# Altium PCB ide_podule-8bit.PcbDoc
Units mm, origin at the board's own origin, x right, y up, seen from the top; angles counter-clockwise.
Board outline 142.24 x 34.29 mm, 4 copper layers (F.Cu, In1.Cu, In2.Cu, B.Cu); 37 components, 113 nets, 366 pads, 163 vias.
Unrouted connection lines stored in the file: 1.
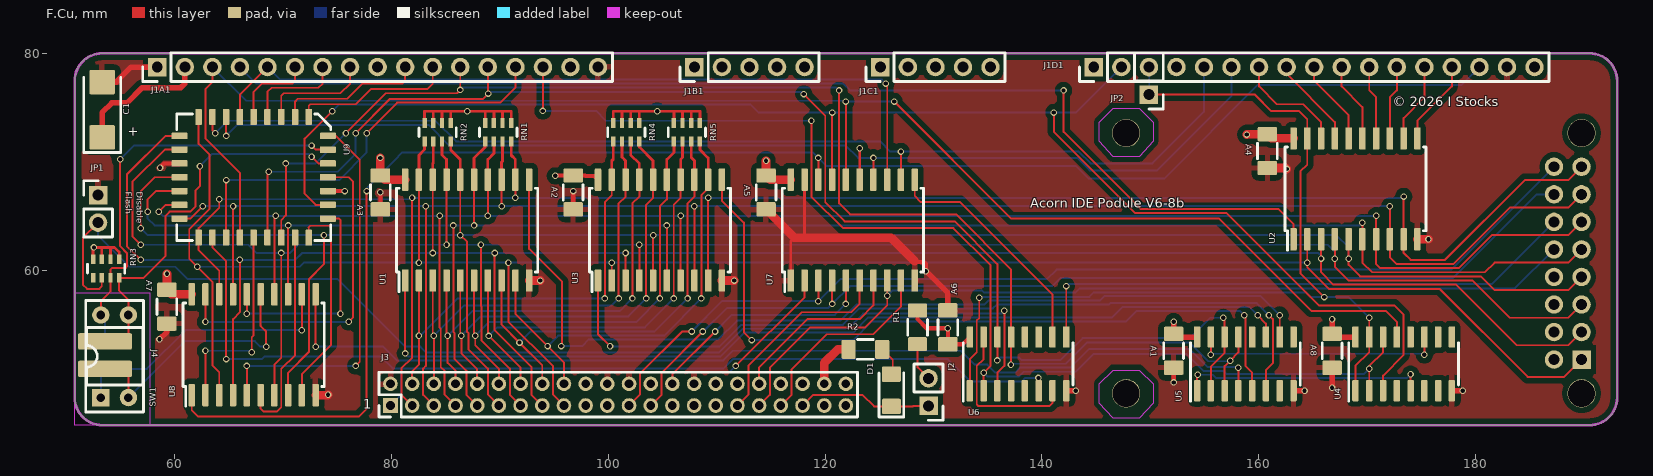
[diagram p0: F.Cu view]
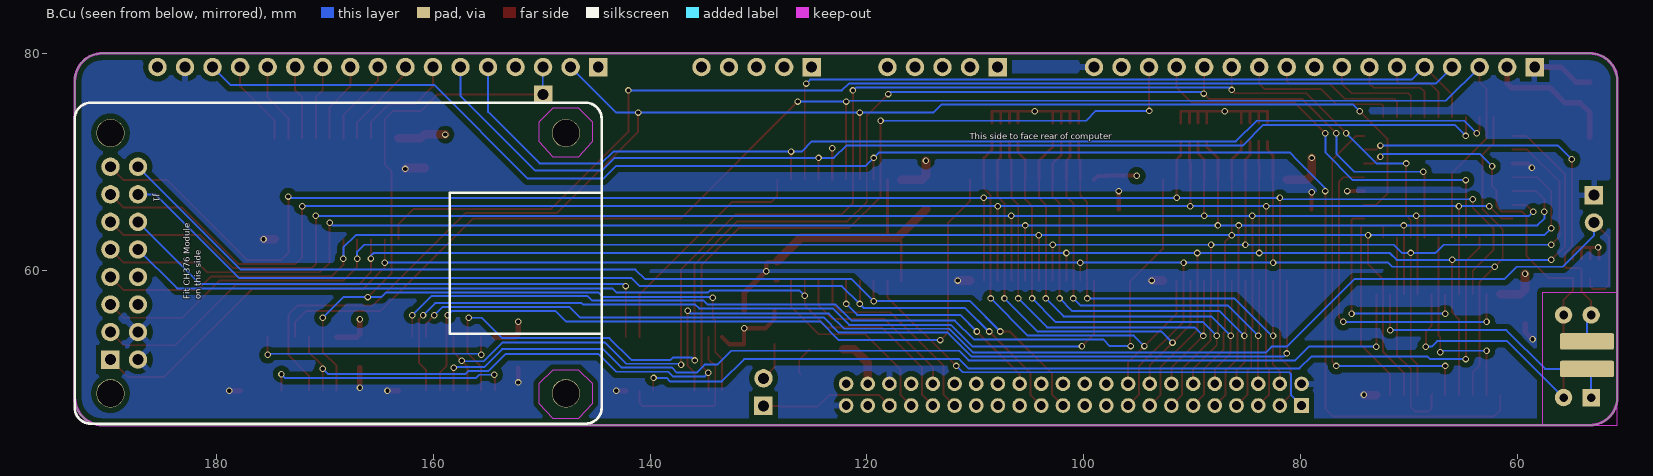
[diagram p1: B.Cu view, seen from below]
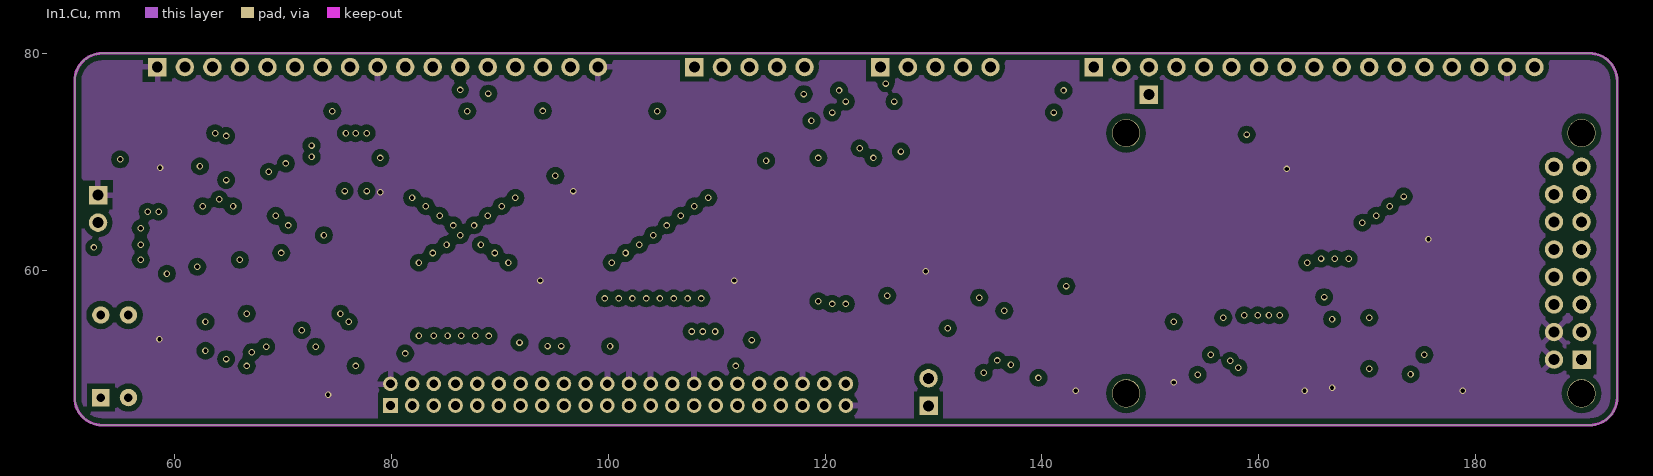
[diagram p2: In1.Cu]
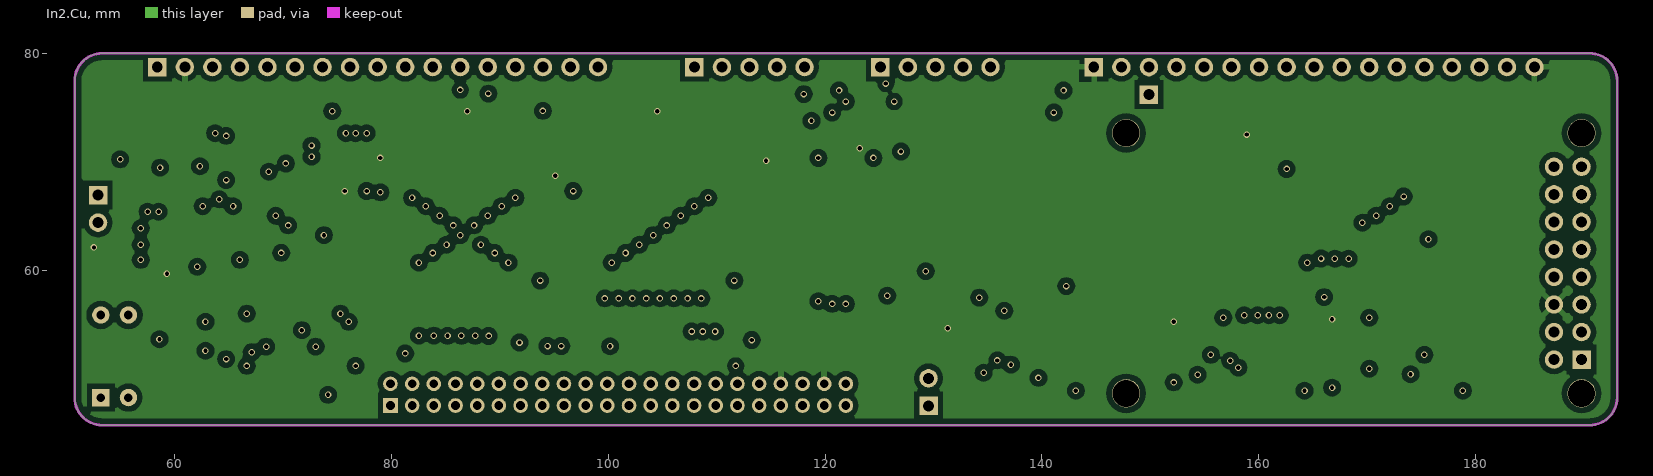
[diagram p3: In2.Cu]

## Layer stack, top to bottom
F.Mask: solder mask 0.0102, Solder Resist, Dk 3.5
F.Cu: signal copper 0.0356
Dielectric 1: dielectric 0.32, FR-4, Dk 4.8
In1.Cu: signal copper 0.0356
Dielectric2: dielectric 0.32, FR-4, Dk 4.8
In2.Cu: signal copper 0.0356
Dielectric3: dielectric 0.32, FR-4, Dk 4.8
B.Cu: signal copper 0.0356
B.Mask: solder mask 0.0102, Solder Resist, Dk 3.5

## Board outline
193.04,77.47 193.04,48.26 cw(c190.5,48.26) 190.5,45.72 53.34,45.72 cw(c53.34,48.26) 50.8,48.26 50.8,77.47 cw(c53.34,77.47) 190.5,80.01 cw(c190.5,77.47) 193.04,77.47

## Design rules (kind name [scope] priority, off if disabled: settings)
Clearance "Clearence 0.508_Polygon" [InNamedPolygon('F.Cu-GND') OR InNamedPolygon('In1.Cu-GND') OR InNamedPolygon('B.Cu-GND') OR InNamedPolygon('In2.Cu-VCC')] p1: gap=0.508 ignorepadtopadclearanceinfootprint=FALSE
Clearance "Clearence 0.2_NetClass" [InNetClass('Power')] p2: gap=0.2 ignorepadtopadclearanceinfootprint=FALSE
Clearance "Clearence 0.1778_NetClass" [InNetClass('Default')] p3: gap=0.178 ignorepadtopadclearanceinfootprint=FALSE
MinimumSolderMaskSliver [All] p1: minsoldermaskwidth=0
PolygonConnect Polygon_In2.Cu-VCC_ConnectDirect [IsNamedPolygon('In2.Cu-VCC') vs IsVia] p1: connectstyle=Direct reliefconductorwidth=0.254 reliefentries=4 polygonreliefangle="90 Angle" airgapwidth=0.254
PolygonConnect Polygon_In2.Cu-VCC_ConnectRelief45 [IsNamedPolygon('In2.Cu-VCC') vs (IsThruPin or IsSMTPin) and (PadShape_AllLayers = 'Round')] p2: connectstyle=Relief reliefconductorwidth=0.508 reliefentries=4 polygonreliefangle="45 Angle" airgapwidth=0.508
PolygonConnect Polygon_In2.Cu-VCC_ConnectRelief90 [IsNamedPolygon('In2.Cu-VCC') vs (IsThruPin or IsSMTPin) and (PadShape_AllLayers <> 'Round')] p3: connectstyle=Relief reliefconductorwidth=0.508 reliefentries=4 polygonreliefangle="90 Angle" airgapwidth=0.508
PolygonConnect Polygon_B.Cu-GND_ConnectDirect [IsNamedPolygon('B.Cu-GND') vs IsVia] p4: connectstyle=Direct reliefconductorwidth=0.254 reliefentries=4 polygonreliefangle="90 Angle" airgapwidth=0.254
PolygonConnect Polygon_B.Cu-GND_ConnectRelief45 [IsNamedPolygon('B.Cu-GND') vs (IsThruPin or IsSMTPin) and (PadShape_AllLayers = 'Round')] p5: connectstyle=Relief reliefconductorwidth=0.508 reliefentries=4 polygonreliefangle="45 Angle" airgapwidth=0.508
PolygonConnect Polygon_B.Cu-GND_ConnectRelief90 [IsNamedPolygon('B.Cu-GND') vs (IsThruPin or IsSMTPin) and (PadShape_AllLayers <> 'Round')] p6: connectstyle=Relief reliefconductorwidth=0.508 reliefentries=4 polygonreliefangle="90 Angle" airgapwidth=0.508
PolygonConnect Polygon_In1.Cu-GND_ConnectDirect [IsNamedPolygon('In1.Cu-GND') vs IsVia] p7: connectstyle=Direct reliefconductorwidth=0.254 reliefentries=4 polygonreliefangle="90 Angle" airgapwidth=0.254
PolygonConnect Polygon_In1.Cu-GND_ConnectRelief45 [IsNamedPolygon('In1.Cu-GND') vs (IsThruPin or IsSMTPin) and (PadShape_AllLayers = 'Round')] p8: connectstyle=Relief reliefconductorwidth=0.508 reliefentries=4 polygonreliefangle="45 Angle" airgapwidth=0.508
PolygonConnect Polygon_In1.Cu-GND_ConnectRelief90 [IsNamedPolygon('In1.Cu-GND') vs (IsThruPin or IsSMTPin) and (PadShape_AllLayers <> 'Round')] p9: connectstyle=Relief reliefconductorwidth=0.508 reliefentries=4 polygonreliefangle="90 Angle" airgapwidth=0.508
PolygonConnect Polygon_F.Cu-GND_ConnectDirect [IsNamedPolygon('F.Cu-GND') vs IsVia] p10: connectstyle=Direct reliefconductorwidth=0.254 reliefentries=4 polygonreliefangle="90 Angle" airgapwidth=0.254
PolygonConnect Polygon_F.Cu-GND_ConnectRelief45 [IsNamedPolygon('F.Cu-GND') vs (IsThruPin or IsSMTPin) and (PadShape_AllLayers = 'Round')] p11: connectstyle=Relief reliefconductorwidth=0.508 reliefentries=4 polygonreliefangle="45 Angle" airgapwidth=0.508
PolygonConnect Polygon_F.Cu-GND_ConnectRelief90 [IsNamedPolygon('F.Cu-GND') vs (IsThruPin or IsSMTPin) and (PadShape_AllLayers <> 'Round')] p12: connectstyle=Relief reliefconductorwidth=0.508 reliefentries=4 polygonreliefangle="90 Angle" airgapwidth=0.508
RoutingVias [All] p1: holewidth=0.711 width=1.27 viastyle="Through Hole" minholewidth=0.711 minwidth=1.27 maxholewidth=0.711 maxwidth=1.27
SilkToSilkClearance [All] p1: silktosilkclearance=0
SilkToSolderMaskClearance [IsPad] p1: minsilkscreentomaskgap=0 clearancetoexposedcopper=TRUE
SolderMaskExpansion [All] p1: expansion=0 istentingtop=FALSE
Width [All] p1: maxlimit=10 minlimit=0.254 preferedwidth=0.254 toplayer_prefwidth=0.178 midlayer1_maxwidth=0.254 midlayer2_prefwidth=0.178 bottomlayer_prefwidth=0.178 minimp=50.000000 maximp=50.000000 favimp=50.000000
27 further rules are at their usual default settings.

## Classes and differential pairs
net class Power: GND VCC
net class Default: BCS0 BCSEL BD0 BD1 BD2 BD3 BD4 BD5 BD6 BD7 BLA2 BLA3 BLA4 CLK2 CS0 D0 D1 D2 D3 D4 D5 D6 D7 D8 D9 D10 D11 D12 D13 D14 D15 F_CE F_EN L0 L1 L2 L3 L4 L5 L6 L7 LA2 LA3 LA4 LA5 LA6 LA7 LA8 LA9 LA10 LA11 LA12 LA13 LRC LROE LWC LWOE Net-(D1-A) Net-(D1-K) Net-(J1D1-P3) Net-(J2-P2) Net-(J4-Pin_2) Net-(J4-Pin_4) Net-(U4A-O1) Net-(U4B-O1) Net-(U6A-O3) PLatch PR{slash}{\W\}\ unconnected-(J1-Pin_8-Pad8) unconnected-(J1A1-P16-Pad16) unconnected-(J1B1-P1-Pad1) unconnected-(J1B1-P2-Pad2) unconnected-(J1B1-P3-Pad3) unconnected-(J1B1-P4-Pad4) unconnected-(J1B1-P5-Pad5) unconnected-(J1C1-P1-Pad1) unconnected-(J1C1-P2-Pad2) unconnected-(J1C1-P3-Pad3) unconnected-(J1C1-P4-Pad4) unconnected-(J1C1-P5-Pad5) unconnected-(J3-P19-Pad19) unconnected-(J3-P20-Pad20) unconnected-(J3-P21-Pad21) unconnected-(J3-P27-Pad27) unconnected-(J3-P29-Pad29) unconnected-(J3-P31-Pad31) unconnected-(J3-P32-Pad32) unconnected-(J3-P34-Pad34) unconnected-(J3-P44-Pad44) unconnected-(RN3-R4.2-Pad5) unconnected-(U4A-O0-Pad4) unconnected-(U4A-O2-Pad6) unconnected-(U4A-O3-Pad7) unconnected-(U4B-O0-Pad12) unconnected-(U4B-O2-Pad10) unconnected-(U4B-O3-Pad9) unconnected-(U5A-O3-Pad7) unconnected-(U5B-O0-Pad12) unconnected-(U5B-O3-Pad9) unconnected-(U6A-O0-Pad4) unconnected-(U6A-O1-Pad5) unconnected-(U6B-O0-Pad12) unconnected-(U6B-O1-Pad11) {\B\I\O\R\D\}\ {\B\I\O\W\R\}\ {\I\O\R\D\}\ {\I\O\W\R\}\ {\P\S\}\ {\R\S\T\-\B\}\ {\R\S\T\}\ {\U\S\B\_\C\S\}\

## Components (designator, comment, footprint, x,y, rotation, side; value= is the part's Value field where it differs from the comment)
A1 "Comment" C_1206_3216Metric_Pad1.33x1.80mm_HandSolder 152.146,52.578 r270 top value=100n
A2 "Comment" C_1206_3216Metric_Pad1.33x1.80mm_HandSolder 96.774,67.183 r270 top value=100n
A3 "Comment" C_1206_3216Metric_Pad1.33x1.80mm_HandSolder 78.994,67.183 r270 top value=100n
A4 "Comment" C_1206_3216Metric_Pad1.33x1.80mm_HandSolder 160.782,70.993 r270 top value=100n
A5 "Comment" C_1206_3216Metric_Pad1.33x1.80mm_HandSolder 114.554,67.183 r270 top value=100n
A6 "Comment" C_1206_3216Metric_Pad1.33x1.80mm_HandSolder 131.318,54.737 r90 top value=100n
A7 "Comment" C_1206_3216Metric_Pad1.33x1.80mm_HandSolder 59.309,56.642 r270 top value=100n
A8 "Comment" C_1206_3216Metric_Pad1.33x1.80mm_HandSolder 166.751,52.578 r270 top value=100n
C1 "Comment" CP_EIA-6032-20_AVX-F_Pad2.25x2.35mm_HandSolder 53.34,74.803 r90 top value="47uF 16V"
D1 "Comment" LED_1206_3216Metric_Pad1.42x1.75mm_HandSolder 126.111,48.931 r90 top value=LED
J1 "Comment" CH376-mod 189.758,69.545 r90 bottom value=Conn_02x08_Odd_Even
J1A1 "Comment" PinHeader_1x17_P2.54mm_Vertical 58.42,78.74 r90 top value=CONN_01X17
J1B1 "Comment" PinHeader_1x05_P2.54mm_Vertical 107.95,78.74 r90 top value=CONN_01X05
J1C1 "Comment" PinHeader_1x05_P2.54mm_Vertical 125.095,78.74 r90 top value=CONN_01X05
J1D1 "Comment" PinHeader_1x17_P2.54mm_Vertical 144.78,78.74 r90 top value=CONN_01X17
J2 "Comment" PinHeader_1x02_P2.54mm_Vertical 129.54,47.498 r180 top value=CONN_01X02
J3 "Comment" PinHeader_2x22_P2.00mm_Vertical 79.92,47.53 r90 top value=CONN_02X20
J4 "Comment" "4 way edge" 51.054,50.902 r90 top value=Conn_01x04_Socket
JP1 "Comment" PinHeader_1x02 52.959,66.934 r0 top value=Jumper_NC_Small
JP2 "Comment" PinHeader_1x02-linked 149.86,76.195 r180 top value=Jumper
R1 "Comment" R_1206_3216Metric_Pad1.30x1.75mm_HandSolder 128.524,54.737 r90 top value=330R
R2 "Comment" R_1206_3216Metric_Pad1.30x1.75mm_HandSolder 123.724,52.705 r180 top value=330R
RN1 "Comment" R_Array_Concave_4x0603 89.859,72.732 r270 top value=4K7
RN2 "Comment" R_Array_Concave_4x0603 84.271,72.732 r270 top value=4K7
RN3 "Comment" R_Array_Concave_4x0603 53.702,60.159 r270 top value=4K7
RN4 "Comment" R_Array_Concave_4x0603 101.67,72.732 r270 top value=4K7
RN5 "Comment" R_Array_Concave_4x0603 107.258,72.732 r270 top value=4K7
SW1 "Comment" DIP-4_W7.62mm_Socket 53.213,48.26 r90 top value=SW_DIP_x02
U1 "Comment" SOIC-20W_7.5x12.8mm_P1.27mm 86.995,63.705 r90 top value=74HC574
U2 "Comment" SOIC-20W_7.5x12.8mm_P1.27mm 168.91,67.515 r90 top value=74HC245
U3 "Comment" SOIC-20W_7.5x12.8mm_P1.27mm 104.775,63.705 r90 top value=74HC574
U4 "Comment" SOIC-16_3.9x9.9mm_P1.27mm 173.355,51.37 r90 top value=74HC139
U5 "Comment" SOIC-16_3.9x9.9mm_P1.27mm 158.75,51.37 r90 top value=74HC139
U6 "Comment" SOIC-16_3.9x9.9mm_P1.27mm 137.795,51.37 r90 top value=74HC139
U7 "Comment" SOIC-20W_7.5x12.8mm_P1.27mm 122.555,63.705 r90 top value=74HC245
U8 "Comment" SOIC-20W_7.5x12.8mm_P1.27mm 67.31,53.135 r90 top value=74AHC273
U9 "Comment" PLCC-32_11.4x14.0mm_P1.27mm 67.31,68.58 r270 top value=SST39SF010

## Footprints (in the part's own frame and the unit in brackets; to place one, negate y for a bottom-side part, rotate by r counter-clockwise, add the part's x,y. Pads: shape width x height; smd on the part's side, far side on the other; paste and mask are expansions set on the pad)
"4 way edge" [mm]
  rrect25% 1.524x5 smd paste-5 mask+0.2: 1(0,-2.54) 2(2.54,-2.54)
  rrect25% 1.524x5 smd far side paste-5 mask+0.2: 3(0,-2.54) 4(2.54,-2.54)
C_1206_3216Metric_Pad1.33x1.80mm_HandSolder [mm]
  rrect19% 1.325x1.8 smd mask+0.2: 1(-1.562,0) 2(1.562,0)
  silkscreen extent -0.71,-0.91 0.71,0.91
CH376-mod [mm]
  rect 1.7x1.7 hole 1 paste-2539.97 mask+0.2: 1(-17.78,0)
  round 1.7 hole 1 paste-2539.97 mask+0.2: 2(-17.78,-2.54) 3(-15.24,0) 4(-15.24,-2.54) 5(-12.7,0) 6(-12.7,-2.54) 7(-10.16,0) 8(-10.16,-2.54) 9(-7.62,0) 10(-7.62,-2.54) 11(-5.08,0) 12(-5.08,-2.54) 13(-2.54,0) 14(-2.54,-2.54) 15(0,0) 16(0,-2.54)
  round 2.6 hole 2.5 paste-2539.97 mask+0.2: M(-20.89,-42) M(-20.89,0) M(3.11,-42) M(3.11,0)
  silkscreen extent -23.69,-45.3 5.91,3.3
CP_EIA-6032-20_AVX-F_Pad2.25x2.35mm_HandSolder [mm]
  rrect11% 2.25x2.35 smd mask+0.2: 1(-2.55,0) 2(2.55,0)
  silkscreen extent -3.94,-1.71 3,1.71
DIP-4_W7.62mm_Socket [mm]
  rect 1.6x1.6 hole 0.8 paste-2539.97 mask+0.2: 1(0,0)
  rrect100% 1.6x1.6 hole 0.8 paste-2539.97 mask+0.2: 2(0,-2.54) 3(7.62,-2.54) 4(7.62,0)
  silkscreen extent -1.33,-3.93 8.95,1.39
LED_1206_3216Metric_Pad1.42x1.75mm_HandSolder [mm]
  rrect18% 1.425x1.75 smd mask+0.2: 1(-1.488,0) 2(1.488,0)
  silkscreen extent -2.46,-1.13 1.6,1.13
PinHeader_1x02 [mm]
  rect 1.7x1.7 hole 1 paste-2539.97 mask+0.2: 1(0,0)
  rrect100% 1.7x1.7 hole 1 paste-2539.97 mask+0.2: 2(0,-2.54)
  silkscreen extent -1.33,-3.87 1.33,1.33
PinHeader_1x02-linked [mm]
  rect 1.7x1.7 hole 1 paste-2539.97 mask+0.2: 1(0,0)
  rrect100% 1.7x1.7 hole 1 paste-2539.97 mask+0.2: 2(0,-2.54)
  B.Cu region: 0,-1.778 -0.063,-1.778 -0.063,-0.762 0,-0.762
  silkscreen extent -1.33,-3.87 1.33,1.33
PinHeader_1x02_P2.54mm_Vertical [mm]
  rect 1.7x1.7 hole 1 paste-2539.97 mask+0.2: 1(0,0)
  rrect100% 1.7x1.7 hole 1 paste-2539.97 mask+0.2: 2(0,-2.54)
  silkscreen extent -1.33,-3.87 1.33,1.33
PinHeader_1x05_P2.54mm_Vertical [mm]
  rect 1.7x1.7 hole 1 paste-2539.97 mask+0.2: 1(0,0)
  rrect100% 1.7x1.7 hole 1 paste-2539.97 mask+0.2: 2(0,-2.54) 3(0,-5.08) 4(0,-7.62) 5(0,-10.16)
  silkscreen extent -1.33,-11.49 1.33,1.33
PinHeader_1x17_P2.54mm_Vertical [mm]
  rect 1.7x1.7 hole 1 paste-2539.97 mask+0.2: 1(0,0)
  rrect100% 1.7x1.7 hole 1 paste-2539.97 mask+0.2: 2(0,-2.54) 3(0,-5.08) 4(0,-7.62) 5(0,-10.16) 6(0,-12.7) 7(0,-15.24) 8(0,-17.78) 9(0,-20.32) 10(0,-22.86) 11(0,-25.4) 12(0,-27.94) 13(0,-30.48) 14(0,-33.02) 15(0,-35.56) 16(0,-38.1) 17(0,-40.64)
  silkscreen extent -1.33,-41.97 1.33,1.33
PinHeader_2x22_P2.00mm_Vertical [mm]
  rect 1.35x1.35 hole 0.8 paste-2539.97 mask+0.2: 1(0,0)
  rrect100% 1.35x1.35 hole 0.8 paste-2539.97 mask+0.2: 2(2,0) 3(0,-2) 4(2,-2) 5(0,-4) 6(2,-4) 7(0,-6) 8(2,-6) 9(0,-8) 10(2,-8) 11(0,-10) 12(2,-10) 13(0,-12) 14(2,-12) 15(0,-14) 16(2,-14) 17(0,-16) 18(2,-16) 19(0,-18) 20(2,-18) 21(0,-20) 22(2,-20) 23(0,-22) 24(2,-22) 25(0,-24) 26(2,-24) 27(0,-26) 28(2,-26) 29(0,-28) 30(2,-28) 31(0,-30) 32(2,-30) 33(0,-32) 34(2,-32) 35(0,-34) 36(2,-34) 37(0,-36) 38(2,-36) 39(0,-38) 40(2,-38) 41(0,-40) 42(2,-40) 43(0,-42) 44(2,-42)
  silkscreen extent -1.06,-43.06 3.06,1.06
PLCC-32_11.4x14.0mm_P1.27mm [mm]
  rrect25% 0.6x1.475 smd mask+0.2: 1(0,6.837) 2(-1.27,6.837) 3(-2.54,6.837) 4(-3.81,6.837) 14(-3.81,-6.837) 15(-2.54,-6.837) 16(-1.27,-6.837) 17(0,-6.837) 18(1.27,-6.837) 19(2.54,-6.837) 20(3.81,-6.837) 30(3.81,6.837) 31(2.54,6.837) 32(1.27,6.837)
  rrect25% 1.475x0.6 smd mask+0.2: 5(-5.563,5.08) 6(-5.563,3.81) 7(-5.563,2.54) 8(-5.563,1.27) 9(-5.563,0) 10(-5.563,-1.27) 11(-5.563,-2.54) 12(-5.563,-3.81) 13(-5.563,-5.08) 21(5.563,-5.08) 22(5.563,-3.81) 23(5.563,-2.54) 24(5.563,-1.27) 25(5.563,0) 26(5.563,1.27) 27(5.563,2.54) 28(5.563,3.81) 29(5.563,5.08)
  silkscreen extent -5.82,-7.09 5.82,7.09
R_1206_3216Metric_Pad1.30x1.75mm_HandSolder [mm]
  rrect19% 1.3x1.75 smd mask+0.2: 1(-1.55,0) 2(1.55,0)
  silkscreen extent -0.73,-0.91 0.73,0.91
R_Array_Concave_4x0603 [mm]
  rect 0.9x0.4 smd mask+0.2: 1(-0.85,1.2) 2(-0.85,0.4) 3(-0.85,-0.4) 4(-0.85,-1.2) 5(0.85,-1.2) 6(0.85,-0.4) 7(0.85,0.4) 8(0.85,1.2)
  silkscreen extent -0.4,-1.72 0.4,1.72
SOIC-16_3.9x9.9mm_P1.27mm [mm]
  rrect25% 1.95x0.6 smd mask+0.2: 1(-2.475,4.445) 2(-2.475,3.175) 3(-2.475,1.905) 4(-2.475,0.635) 5(-2.475,-0.635) 6(-2.475,-1.905) 7(-2.475,-3.175) 8(-2.475,-4.445) 9(2.475,-4.445) 10(2.475,-3.175) 11(2.475,-1.905) 12(2.475,-0.635) 13(2.475,0.635) 14(2.475,1.905) 15(2.475,3.175) 16(2.475,4.445)
  silkscreen extent -3.45,-5.06 1.95,5.06
SOIC-20W_7.5x12.8mm_P1.27mm [mm]
  rrect25% 2.05x0.6 smd mask+0.2: 1(-4.65,5.715) 2(-4.65,4.445) 3(-4.65,3.175) 4(-4.65,1.905) 5(-4.65,0.635) 6(-4.65,-0.635) 7(-4.65,-1.905) 8(-4.65,-3.175) 9(-4.65,-4.445) 10(-4.65,-5.715) 11(4.65,-5.715) 12(4.65,-4.445) 13(4.65,-3.175) 14(4.65,-1.905) 15(4.65,-0.635) 16(4.65,0.635) 17(4.65,1.905) 18(4.65,3.175) 19(4.65,4.445) 20(4.65,5.715)
  silkscreen extent -5.68,-6.51 3.86,6.51

## Part data
A1 A2 A3 A4 A5 A6 A7 A8: library part C_1206_3216Metric_Pad1.33x1.80mm_HandSolder, "Capacitor SMD 1206 (3216 Metric), square (rectangular) end terminal, IPC_7351 nominal with elongated pad for handsoldering. (Body size source: IPC-SM-782 page 76, https://www.pcb-3d.com/wordpress/wp-content/uploads/ipc-sm-782a_amendment_1_and_2.pdf), generated with kicad-footprint-generator", Footprint=Capacitor_SMD:C_1206_3216Metric_Pad1.33x1.80mm_HandSolder, ki_fp_filters=C_*
C1: library part CP_EIA-6032-20_AVX-F_Pad2.25x2.35mm_HandSolder, "Tantalum Capacitor SMD AVX-F (6032-20 Metric), IPC_7351 nominal, (Body size from: http://www.kemet.com/Lists/ProductCatalog/Attachments/253/KEM_TC101_STD.pdf), generated with kicad-footprint-generator", Footprint=Capacitor_Tantalum_SMD:CP_EIA-6032-20_AVX-F_Pad2.25x2.35mm_HandSolder, ki_fp_filters=CP_*
D1: library part LED_1206_3216Metric_Pad1.42x1.75mm_HandSolder, "LED SMD 1206 (3216 Metric), square (rectangular) end terminal, IPC_7351 nominal, (Body size source: http://www.tortai-tech.com/upload/download/2011102023233369053.pdf), generated with kicad-footprint-generator", Footprint=LED_SMD:LED_1206_3216Metric_Pad1.42x1.75mm_HandSolder, Description="Light emitting diode", ki_fp_filters="LED* LED_SMD:* LED_THT:*"
J1: library part CH376-mod, Footprint=Library:CH376-mod, Description="Generic connector, double row, 02x08, odd/even pin numbering scheme (row 1 odd numbers, row 2 even numbers), script generated (kicad-library-utils/schlib/autogen/connector/)", ki_fp_filters=Connector*:*_2x??_*
J1A1 J1D1: library part PinHeader_1x17_P2.54mm_Vertical, "Through hole straight pin header, 1x17, 2.54mm pitch, single row", Footprint=Connector_PinHeader_2.54mm:PinHeader_1x17_P2.54mm_Vertical, ki_fp_filters="Pin_Header_Straight_1X* Pin_Header_Angled_1X* Socket_Strip_Straight_1X* Socket_Strip_Angled_1X*"
J1B1 J1C1: library part PinHeader_1x05_P2.54mm_Vertical, "Through hole straight pin header, 1x05, 2.54mm pitch, single row", Footprint=Connector_PinHeader_2.54mm:PinHeader_1x05_P2.54mm_Vertical, ki_fp_filters="Pin_Header_Straight_1X* Pin_Header_Angled_1X* Socket_Strip_Straight_1X* Socket_Strip_Angled_1X*"
J2: library part PinHeader_1x02_P2.54mm_Vertical, "Through hole straight pin header, 1x02, 2.54mm pitch, single row", Footprint=Connector_PinHeader_2.54mm:PinHeader_1x02_P2.54mm_Vertical, ki_fp_filters="Pin_Header_Straight_1X* Pin_Header_Angled_1X* Socket_Strip_Straight_1X* Socket_Strip_Angled_1X*"
J3: library part PinHeader_2x22_P2.00mm_Vertical, "Through hole straight pin header, 2x22, 2.00mm pitch, double rows", Footprint=Connector_PinHeader_2.00mm:PinHeader_2x22_P2.00mm_Vertical, ki_fp_filters="Pin_Header_Straight_2X* Pin_Header_Angled_2X* Socket_Strip_Straight_2X* Socket_Strip_Angled_2X*"
J4: library part "4 way edge", Footprint="Library:4 way edge", Description="Generic connector, single row, 01x04, script generated", ki_fp_filters=Connector*:*_1x??_*
JP1: library part PinHeader_1x02, "Through hole straight pin header, 1x02, 2.54mm pitch, single row", Footprint=econet:PinHeader_1x02, ki_fp_filters=SolderJumper*Bridged*
JP2: library part PinHeader_1x02-linked, "Through hole straight pin header, 1x02, 2.54mm pitch, single row", Footprint=econet:PinHeader_1x02-linked, ki_fp_filters=SolderJumper*
R1 R2: library part R_1206_3216Metric_Pad1.30x1.75mm_HandSolder, "Resistor SMD 1206 (3216 Metric), square (rectangular) end terminal, IPC_7351 nominal with elongated pad for handsoldering. (Body size source: IPC-SM-782 page 72, https://www.pcb-3d.com/wordpress/wp-content/uploads/ipc-sm-782a_amendment_1_and_2.pdf), generated with kicad-footprint-generator", Footprint=Resistor_SMD:R_1206_3216Metric_Pad1.30x1.75mm_HandSolder, ki_fp_filters="R_* R_*"
RN1 RN2 RN3 RN4 RN5: library part R_Array_Concave_4x0603, "Thick Film Chip Resistor Array, Wave soldering, Vishay CRA06P (see cra06p.pdf)", Footprint=Resistor_SMD:R_Array_Concave_4x0603, Description=C1980, ki_fp_filters="DIP* SOIC*"
SW1: library part DIP-4_W7.62mm_Socket, "4-lead though-hole mounted DIP package, row spacing 7.62 mm (300 mils), Socket", Footprint=Package_DIP:DIP-4_W7.62mm_Socket, Description="2x DIP Switch, Single Pole Single Throw (SPST) switch, small symbol", ki_fp_filters=SW?DIP?x2*
U1 U2 U3 U7 U8: library part SOIC-20W_7.5x12.8mm_P1.27mm, "SOIC, 20 Pin (JEDEC MS-013AC, https://www.analog.com/media/en/package-pcb-resources/package/233848rw_20.pdf), generated with kicad-footprint-generator ipc_gullwing_generator.py", Footprint=Package_SO:SOIC-20W_7.5x12.8mm_P1.27mm
  U1 U3: Description=C22374074
  U8: Datasheet=https://assets.nexperia.com/documents/data-sheet/74AHC_AHCT273.pdf, ki_fp_filters="DIP?20* SO?20* SOIC?20*"
U4 U5 U6: library part SOIC-16_3.9x9.9mm_P1.27mm, "SOIC, 16 Pin (JEDEC MS-012AC, https://www.analog.com/media/en/package-pcb-resources/package/pkg_pdf/soic_narrow-r/r_16.pdf), generated with kicad-footprint-generator ipc_gullwing_generator.py", Footprint=Package_SO:SOIC-16_3.9x9.9mm_P1.27mm, Datasheet=http://www.ti.com/lit/gpn/sn74LS139, ki_fp_filters=DIP?16*
U9: library part PLCC-32_11.4x14.0mm_P1.27mm, "PLCC, 32 Pin (http://ww1.microchip.com/downloads/en/DeviceDoc/doc0015.pdf), generated with kicad-footprint-generator ipc_plcc_jLead_generator.py", Footprint=Package_LCC:PLCC-32_11.4x14.0mm_P1.27mm, Description=C645928

## Via types
v1: diameter 0.6, hole 0.4, F.Cu to B.Cu, tented both sides, 163 vias

## Nets (pads, with @x,y where several pads share a name; then routed paths per layer and width w, separated by ;. In a path a pad name is that pad's centre, name@x,y a point inside that pad or via, vN(x,y) a via of type N, cw(c..) or ccw(c..) an arc to the next point about the centre after c; other vN are vias at no path point)
BCS0: J3.37 U7.9 | length 18.6
  F.Cu w0.178: J3.37 116.916,48.526 116.916,50.876 120.142,54.102 124.46,54.102 127,56.642 U7.9
BCSEL: J3.28 U7.5 | length 21.7
  F.Cu w0.178: J3.28 105.92,50.421 v1(109.855,54.356) ; v1(121.92,56.896) U7.5
  B.Cu w0.178: v1(109.855,54.356) 111.379,55.88 120.904,55.88 v1(121.92,56.896)
BD0: J1D1.7 U2.18 | length 10.4
  F.Cu w0.178: J1D1.7 160.02,76.962 161.671,75.311 164.084,75.311 165.735,73.66 U2.18
BD1: J1D1.8 U2.17 | length 8.4
  F.Cu w0.178: J1D1.8 162.56,78.105 167.005,73.66 U2.17
BD2: J1D1.9 U2.16 | length 7.9
  F.Cu w0.178: J1D1.9 165.1,77.47 168.275,74.295 U2.16
BD3: J1D1.10 U2.15 | length 7.4
  F.Cu w0.178: J1D1.10 167.64,76.962 169.545,75.057 U2.15
BD4: J1D1.11 U2.14 | length 6.8
  F.Cu w0.178: J1D1.11 170.18,76.581 170.815,75.946 U2.14
BD5: J1D1.12 U2.13 | length 6.8
  F.Cu w0.178: U2.13 172.085,75.946 172.72,76.581 J1D1.12
BD6: J1D1.13 U2.12 | length 7.4
  F.Cu w0.178: U2.12 173.355,74.041 175.26,75.946 J1D1.13
BD7: J1D1.14 U2.11 | length 7.9
  F.Cu w0.178: U2.11 174.625,73.787 177.8,76.962 J1D1.14
BLA2: J1.10 J3.35 U7.8 | length 82.8
  F.Cu w0.178: J3.35 114.91,48.52 114.91,51.029 118.618,54.737 123.698,54.737 125.73,56.769 v1(125.73,57.658) U7.8
  B.Cu w0.178: v1(125.73,57.658) 126.191,58.119 134.478,58.119 134.635,57.963 143.104,57.963 143.463,58.322 183.615,58.322 J1.10
BLA3: J3.33 U7.6 | length 18.9
  F.Cu w0.178: J3.33 112.928,48.538 112.928,51.206 117.856,56.134 122.428,56.134 123.19,56.896 U7.6
BLA4: J3.36 U7.7 | length 16.7
  F.Cu w0.178: J3.36 113.92,51.055 118.364,55.499 123.19,55.499 124.46,56.769 U7.7
CLK2: J1D1.4
CS0: U6.10 U7.11 | length 21.9
  F.Cu w0.178: U7.11 128.27,66.853 128.829,66.294 132.461,66.294 140.97,57.785 U6.10
D0: J1.1 J3.17 RN2.5 U1.19 U2.2 U3.2 U8.3 U9.13 | length 191.6
  F.Cu w0.178: U9.13 62.23,71.653 63.246,70.637 63.246,65.659 61.366,63.779 61.366,61.062 v1(62.103,60.325) 63.5,58.928 63.5,51.232 64.135,50.597 U8.3 ; v1(82.55,60.706) U1.19 ; v1(90.805,60.706) 90.805,55.245 94.92,51.13 94.92,48.53 J3.17 ; U3.2 v1(100.33,60.706) ; U2.2 v1(164.465,60.706) 164.465,60.289 166.461,58.293 176.657,58.293 184.785,50.165 188.157,50.165 J1.1
  F.Cu w0.254: U1.19 82.55,70.612 83.071,71.133 RN2.5
  B.Cu w0.178: v1(62.103,60.325) 71.552,60.325 71.933,60.706 v1(82.55,60.706) v1(90.805,60.706) v1(100.33,60.706) v1(164.465,60.706)
D1: J1.3 J3.15 RN2.6 U1.18 U2.3 U3.3 U8.4 U9.14 | length 196
  F.Cu w0.178: v1(56.896,60.96) 55.626,62.23 55.626,68.834 59.182,72.39 U9.14 ; U8.4 65.405,55.499 66.04,56.134 v1(66.04,60.96) ; v1(83.82,61.595) U1.18 ; v1(89.535,61.595) 89.535,54.483 92.913,51.105 92.913,48.537 J3.15 ; U3.3 v1(101.6,61.595) ; U2.3 v1(165.735,61.087) 165.735,59.817 166.878,58.674 178.181,58.674 183.769,53.086 188.538,53.086 J1.3
  F.Cu w0.254: U1.18 83.82,69.85 83.871,69.901 RN2.6
  B.Cu w0.178: v1(56.896,60.96) v1(66.04,60.96) 71.158,60.96 71.793,61.595 v1(83.82,61.595) v1(89.535,61.595) v1(101.6,61.595) 165.481,61.595 165.735,61.341 v1(165.735,61.087)
D2: J1.5 J3.13 RN2.7 U1.17 U2.4 U3.4 U8.7 U9.15 | length 193.8
  F.Cu w0.178: v1(56.896,62.357) 56.134,63.119 56.134,68.148 59.106,71.12 U9.15 ; U8.7 69.215,51.283 69.85,51.918 v1(69.85,61.599) ; v1(85.09,62.357) U1.17 ; v1(88.265,62.357) 88.265,56.71 88.333,56.642 88.333,53.526 90.932,50.927 90.932,48.518 J3.13 ; U3.4 v1(102.87,62.357) ; U2.4 v1(167.005,61.062) 167.005,60.325 168.275,59.055 179.705,59.055 183.134,55.626 188.538,55.626 J1.5
  F.Cu w0.254: RN2.7 84.671,70.65 85.09,70.231 U1.17
  B.Cu w0.178: v1(56.896,62.357) 66.802,62.357 67.56,61.599 v1(69.85,61.599) 70.667,61.599 71.425,62.357 v1(85.09,62.357) v1(88.265,62.357) v1(102.87,62.357) 166.37,62.357 167.005,61.722 v1(167.005,61.062)
D3: J1.7 J3.11 RN2.8 U1.16 U2.5 U3.5 U8.8 U9.17 | length 192.5
  F.Cu w0.178: v1(56.896,63.881) 56.896,67.31 58.166,68.58 U9.17 ; U8.8 70.485,50.546 72.41,52.471 72.41,59.188 73.787,60.564 v1(73.787,63.246) ; U1.16 v1(86.36,63.246) 86.995,62.611 86.995,54.325 87.1,54.22 87.1,52.727 88.9,50.927 88.9,48.55 J3.11 ; U3.5 v1(104.14,63.246) ; U2.5 v1(168.275,61.062) 168.275,60.503 169.342,59.436 180.467,59.436 181.737,58.166 188.538,58.166 J1.7
  F.Cu w0.254: RN2.8 85.471,71.12 86.36,70.231 U1.16
  B.Cu w0.178: v1(56.896,63.881) 57.531,63.246 v1(73.787,63.246) v1(86.36,63.246) v1(104.14,63.246) 167.132,63.246 168.275,62.103 v1(168.275,61.062)
D4: J1.9 J3.9 RN1.5 U1.15 U2.6 U3.6 U8.13 U9.18 | length 179.7
  F.Cu w0.178: v1(57.531,65.405) 57.531,66.548 58.293,67.31 U9.18 ; U8.13 v1(70.485,64.135) ; v1(85.725,64.135) 85.725,54.316 85.822,54.219 85.822,51.846 86.919,50.749 86.919,48.531 J3.9 ; v1(87.63,64.135) U1.15 ; U3.6 v1(105.41,64.135) ; v1(169.545,64.389) U2.6 169.545,60.706 170.434,59.817 180.848,59.817 181.737,60.706 188.538,60.706 J1.9
  F.Cu w0.254: U1.15 87.63,70.358 88.659,71.387 RN1.5
  B.Cu w0.178: v1(57.531,65.405) 57.531,64.77 58.166,64.135 v1(70.485,64.135) v1(85.725,64.135) v1(87.63,64.135) v1(105.41,64.135) 169.291,64.135 v1(169.545,64.389)
D5: J1.11 J3.7 RN1.6 U1.14 U2.7 U3.7 U8.14 U9.19 | length 178.4
  F.Cu w0.178: v1(58.547,65.405) 59.182,66.04 U9.19 ; U8.14 69.215,64.893 v1(69.346,65.024) ; v1(84.455,65.024) 84.455,54.725 84.559,54.621 84.559,51.077 84.912,50.724 84.912,48.538 J3.7 ; v1(88.9,65.024) U1.14 ; U3.7 v1(106.68,65.024) ; v1(170.815,65.024) U2.7 170.815,60.579 171.196,60.198 178.435,60.198 181.483,63.246 188.538,63.246 J1.11
  F.Cu w0.254: U1.14 88.9,70.231 89.459,70.79 RN1.6
  B.Cu w0.178: v1(58.547,65.405) 58.928,65.024 v1(69.346,65.024) v1(84.455,65.024) v1(88.9,65.024) v1(106.68,65.024) v1(170.815,65.024)
D6: J1.13 J3.5 RN1.7 U1.13 U2.8 U3.8 U8.17 U9.20 | length 177.3
  F.Cu w0.178: U9.20 61.468,64.77 v1(62.611,65.913) ; U8.17 v1(65.405,65.913) ; v1(83.185,65.913) 83.185,51.181 82.931,50.927 82.931,48.519 J3.5 ; v1(90.17,65.913) U1.13 ; U3.8 v1(107.95,65.913) ; v1(172.085,65.913) U2.8 172.085,61.214 172.72,60.579 177.927,60.579 183.134,65.786 188.538,65.786 J1.13
  F.Cu w0.254: U1.13 90.17,69.977 90.259,70.066 RN1.7
  B.Cu w0.178: v1(62.611,65.913) v1(65.405,65.913) v1(83.185,65.913) v1(90.17,65.913) v1(107.95,65.913) v1(172.085,65.913)
D7: J1.15 J3.3 RN1.8 U1.12 U2.9 U3.9 U8.18 U9.21 | length 178.1
  F.Cu w0.178: v1(64.131,66.552) 64.131,65.782 62.23,63.881 U9.21 62.23,61.849 64.135,59.944 U8.18 ; v1(81.915,66.675) 81.915,51.943 80.924,50.952 80.924,48.526 J3.3 ; v1(91.44,66.675) U1.12 ; U3.9 v1(109.22,66.675) ; v1(173.355,66.802) U2.9 173.355,61.595 173.99,60.96 177.165,60.96 184.531,68.326 188.538,68.326 J1.15
  F.Cu w0.254: RN1.8 91.059,70.612 91.44,70.231 U1.12
  B.Cu w0.178: v1(64.131,66.552) 81.792,66.552 v1(81.915,66.675) v1(91.44,66.675) v1(109.22,66.675) 173.228,66.675 v1(173.355,66.802)
D8: J3.4 RN4.5 U1.2 U3.19 | length 43.2
  F.Cu w0.178: J3.4 81.92,50.668 81.915,50.673 82.55,51.308 U1.2 ; v1(99.695,57.404) 99.695,66.294 100.33,66.929 U3.19
  F.Cu w0.254: U3.19 100.33,70.104 100.47,70.244 RN4.5
  B.Cu w0.178: v1(82.55,53.975) 82.677,53.975 86.106,57.404 v1(99.695,57.404)
D9: J3.6 RN4.6 U1.3 U3.18 | length 42.9
  F.Cu w0.178: U1.3 83.82,54.075 v1(83.92,53.975) J3.6 ; v1(100.965,57.404) 100.965,66.167 101.6,66.802 U3.18
  F.Cu w0.254: RN4.6 101.27,70.434 101.6,70.104 U3.18
  B.Cu w0.178: v1(83.92,53.975) 86.714,56.769 100.33,56.769 v1(100.965,57.404)
D10: J3.8 RN4.7 U1.4 U3.17 | length 43.4
  F.Cu w0.178: U1.4 85.09,54.048 v1(85.183,53.955) 85.183,51.469 85.92,50.732 J3.8 ; v1(102.235,57.404) 102.235,66.167 102.87,66.802 U3.17
  F.Cu w0.254: RN4.7 102.07,70.65 102.87,69.85 U3.17
  B.Cu w0.178: v1(85.183,53.955) 87.489,56.261 101.092,56.261 v1(102.235,57.404)
D11: J3.10 RN4.8 U1.5 U3.16 | length 43.9
  F.Cu w0.178: U1.5 86.36,54.056 v1(86.461,53.955) 86.461,52.35 87.92,50.891 J3.10 ; v1(103.505,57.404) 103.505,66.04 104.14,66.675 U3.16
  F.Cu w0.254: RN4.8 102.87,71.374 104.14,70.104 U3.16
  B.Cu w0.178: v1(86.461,53.955) 88.259,55.753 101.854,55.753 v1(103.505,57.404)
D12: J3.12 RN5.5 U1.6 U3.15 | length 43.9
  F.Cu w0.178: U1.6 87.63,54.061 v1(87.739,53.952) 87.739,53.104 89.92,50.923 J3.12 ; v1(104.775,57.404) 104.775,65.913 105.41,66.548 U3.15
  F.Cu w0.254: U3.15 105.41,70.231 106.058,70.879 RN5.5
  B.Cu w0.178: v1(87.739,53.952) 89.032,55.245 102.616,55.245 v1(104.775,57.404)
D13: J3.14 RN5.6 U1.7 U3.14 | length 44.1
  F.Cu w0.178: U1.7 88.9,54.014 v1(88.972,53.942) 91.92,50.994 J3.14 ; v1(106.045,57.404) 106.045,66.04 106.68,66.675 U3.14
  F.Cu w0.254: U3.14 106.68,70.231 106.858,70.409 RN5.6
  B.Cu w0.178: v1(88.972,53.942) 89.767,54.737 103.378,54.737 v1(106.045,57.404)
D14: J3.16 RN5.7 U1.8 U3.13 | length 43.1
  F.Cu w0.178: U1.8 90.17,54.991 v1(91.821,53.34) 93.92,51.241 J3.16 ; v1(107.315,57.404) 107.315,66.167 107.95,66.802 U3.13
  F.Cu w0.254: RN5.7 107.658,70.396 107.95,70.104 U3.13
  B.Cu w0.178: v1(91.821,53.34) 92.821,54.34 104.251,54.34 v1(107.315,57.404)
D15: J3.18 RN5.8 U1.9 U3.12 | length 42.4
  F.Cu w0.178: U1.9 91.44,55.98 v1(94.404,53.016) 95.92,51.5 J3.18 ; v1(108.585,57.404) 108.585,66.929 109.22,67.564 U3.12
  F.Cu w0.254: RN5.8 108.458,71.12 109.22,70.358 U3.12
  B.Cu w0.178: v1(94.404,53.016) 95.372,53.984 105.165,53.984 v1(108.585,57.404)
F_CE: U6.6 U9.22 | length 89.7
  F.Cu w0.178: U9.22 63.5,62.103 64.77,60.833 v1(64.77,51.816) ; v1(139.679,50.073) 139.7,50.053 U6.6
  B.Cu w0.178: v1(64.77,51.816) 68.072,51.816 68.326,52.07 78.994,52.07 80.112,50.952 110.642,50.952 111.506,51.816 131.318,51.816 133.375,49.759 138.166,49.759 138.48,50.073 v1(139.679,50.073)
F_EN: JP1.2 RN3.6 U6.3 | length 107.6
  F.Cu w0.178: JP1.2 51.562,62.997 51.562,58.674 51.943,58.293 53.086,58.293 53.302,58.509 RN3.6 ; U6.3 135.89,50.546 136.525,51.181 v1(136.525,56.261)
  B.Cu w0.178: JP1.2 52.959,63.192 55.826,60.325 60.071,60.325 61.214,59.182 75.057,59.182 81.28,52.959 82.677,52.959 83.236,52.4 110.195,52.4 112.405,54.61 122.111,54.61 123.507,56.007 136.271,56.007 v1(136.525,56.261)
GND: A1.2 A2.2 A3.2 A4.2 A5.2 A6.2 A7.2 A8.2 C1.2 J1.2 J1.4 J1A1.1 J1A1.9 J1A1.17 J1D1.16 J3.2 J3.22 J3.24 J3.26 J3.30 J3.40 J3.43 JP1.1 U1.10 U2.10 U3.10 U4.8 U5.8 U6.8 U7.1 U7.10 U7.19 U8.10 U9.16 | length 56.5
  F.Cu w0.254: U7.1 116.84,62.649 117.183,62.992 ; U7.19 118.11,63.119 118.237,62.992
  F.Cu w0.381: v1(58.674,69.469) 59.055,69.85 U9.16 ; A3.2 v1(78.994,67.183) ; A2.2 v1(96.774,67.31) ; U7.10 U7.10@128.42,59.055 ; 128.27,60.833 128.346,60.757 129.134,60.757 129.286,60.604 v1(129.286,59.921) ; v1(152.146,49.657) A1.2
  F.Cu w0.508: C1.2 54.62,77.353 56.007,78.74 J1A1.1 ; v1(58.623,53.645) 59.309,54.331 A7.2 ; v1(129.286,59.921) 131.318,57.889 A6.2 ; U6.8 v1(143.129,48.895) ; U5.8 v1(164.211,48.895) ; v1(166.751,49.171) A8.2 ; U4.8 v1(178.816,48.895)
  F.Cu w0.8: U8.10 74.139,48.485 v1(74.168,48.514) ; U1.10 v1(93.726,59.055) ; U3.10 v1(111.633,59.055) ; A5.2 117.183,62.992 118.237,62.992 126.111,62.992 128.27,60.833 ; A4.2 162.471,69.431 v1(162.56,69.342) ; U2.10 v1(175.641,62.865)
L0: U8.2 U9.25 | length 19
  F.Cu w0.178: U8.2 v1(62.865,52.578) ; v1(67.133,52.455) 67.133,53.845 67.31,54.022 U9.25
  B.Cu w0.178: v1(62.865,52.578) 67.01,52.578 v1(67.133,52.455)
L1: U8.5 U9.4 | length 35.7
  F.Cu w0.178: U8.5 v1(66.675,51.181) ; U9.4 74.885,72.39 77.089,70.186 77.089,51.562 v1(76.708,51.181)
  B.Cu w0.178: v1(66.675,51.181) v1(76.708,51.181)
L2: U8.6 U9.28 | length 19.8
  F.Cu w0.178: U8.6@67.814,48.616 U8.6 67.945,47.244 68.199,46.99 69.469,46.99 69.85,47.371 69.85,50.902 71.12,52.172 U9.28
L3: U8.9 U9.29 | length 19.7
  F.Cu w0.178: U8.9 71.755,50.419 74.422,53.086 74.422,63.983 74.295,64.11 72.517,64.11 72.365,63.957 72.39,63.932 U9.29
L4: J4.3 SW1.1 U8.12 | length 25.7
  F.Cu w0.178: v1(71.755,54.483) U8.12
  B.Cu w0.178: SW1.1 53.213,50.521 J4.3 57.455,50.902 61.036,54.483 v1(71.755,54.483)
L5: J4.1 SW1.2 U8.15 | length 24.5
  F.Cu w0.178: J4.1 55.118,50.902 55.753,50.267 SW1.2 ; U8.15 67.945,54.864 68.072,54.737 68.453,54.356 v1(68.453,52.959)
  B.Cu w0.178: SW1.2 60.96,53.467 67.421,53.467 67.929,52.959 v1(68.453,52.959)
L6: U8.16 U9.30 | length 20.3
  F.Cu w0.178: v1(66.675,56.007) U8.16 ; U9.30 75.184,64.77 75.311,64.643 75.311,64.516 v1(75.311,56.007)
  B.Cu w0.178: v1(66.675,56.007) v1(75.311,56.007)
L7: U8.19 U9.1 | length 31.3
  F.Cu w0.178: v1(62.865,55.245) U8.19 ; U9.1 76.073,68.58 76.458,68.195 76.458,55.63 v1(76.073,55.245)
  B.Cu w0.178: v1(62.865,55.245) v1(76.073,55.245)
LA2: J1D1.5 U7.12 U9.12 | length 103.6
  F.Cu w0.178: U9.12 63.5,72.898 v1(63.754,72.644) ; U7.12 v1(127,70.952)
  B.Cu w0.178: v1(63.754,72.644) 64.897,73.787 84.074,73.787 85.979,71.882 125.095,71.882 126.025,70.952 v1(127,70.952) 143.383,70.952 144.485,69.85 150.177,69.85 154.94,74.612 J1D1.5
LA3: J1D1.6 U7.14 U9.11 | length 104.1
  F.Cu w0.178: v1(64.77,72.39) U9.11 ; U7.14 v1(124.46,70.358)
  B.Cu w0.178: v1(64.77,72.39) 65.786,73.406 83.439,73.406 85.319,71.526 121.88,71.526 123.048,70.358 v1(124.46,70.358) 143.256,70.358 144.399,69.215 150.622,69.215 157.48,76.073 J1D1.6
LA4: J1A1.5 U7.13 U9.10 | length 72.2
  F.Cu w0.178: U9.10 66.04,76.2 J1A1.5 ; v1(125.603,77.22) 125.73,77.093 U7.13
  B.Cu w0.178: J1A1.5 69.745,77.575 125.247,77.575 v1(125.603,77.22)
LA5: J1A1.6 U9.9 | length 7.8
  F.Cu w0.178: U9.9 67.31,76.454 68.072,77.216 70.866,77.216 71.12,77.47 J1A1.6
LA6: J1A1.7 U9.8 | length 9.2
  F.Cu w0.178: U9.8 68.58,76.454 68.961,76.835 73.279,76.835 73.66,77.216 J1A1.7
LA7: J1A1.8 U9.7 | length 10.3
  F.Cu w0.178: U9.7 69.85,76.073 70.104,76.327 75.311,76.327 76.2,77.216 J1A1.8
LA8: J1A1.10 U9.6 | length 13.6
  F.Cu w0.178: U9.6 71.12,75.565 71.374,75.819 75.946,75.819 77.343,77.216 81.026,77.216 81.28,77.47 J1A1.10
LA9: J1A1.11 U9.5 | length 14.8
  F.Cu w0.178: U9.5 72.39,75.184 72.517,75.311 76.708,75.311 78.105,76.708 83.312,76.708 83.82,77.216 J1A1.11
LA10: J1A1.12 U5.3 U5.13 U6.13 U9.27 | length 128
  F.Cu w0.178: U9.27 69.85,64.625 70.282,65.056 v1(70.282,69.85) ; v1(75.819,72.644) 79.502,76.327 86.058,76.327 v1(86.36,76.629) J1A1.12 ; v1(121.285,76.581) 121.285,66.167 122.301,65.151 132.08,65.151 137.16,60.071 U6.13 137.16,51.323 v1(137.141,51.305) ; U5.3 156.845,51.159 v1(157.353,51.667) 158.115,52.429 U5.13
  B.Cu w0.178: v1(70.282,69.85) 73.025,69.85 v1(75.819,72.644) ; v1(86.36,76.629) 86.596,76.864 121.002,76.864 v1(121.285,76.581) ; v1(137.141,51.305) 137.221,51.384 142.189,51.384 144.145,53.34 153.614,53.34 155.341,51.613 157.298,51.613 v1(157.353,51.667)
LA11: J1A1.13 U5.2 U5.14 U6.14 U9.26 | length 130
  F.Cu w0.178: U9.26 68.58,68.961 v1(68.707,69.088) ; v1(76.708,72.644) 79.879,75.815 88.468,75.815 v1(88.951,76.298) 88.9,76.348 J1A1.13 ; v1(118.034,76.251) 120.015,74.27 120.015,66.294 121.793,64.516 131.953,64.516 135.89,60.579 U6.14 v1(135.89,51.689) ; U5.2 155.575,51.123 156.018,51.566 156.845,52.393 U5.14 156.845,55.499 v1(156.718,55.626)
  B.Cu w0.178: v1(68.707,69.088) 75.057,69.088 76.708,70.739 v1(76.708,72.644) ; v1(88.951,76.298) 89.107,76.454 117.831,76.454 v1(118.034,76.251) ; v1(135.89,51.689) 136.145,51.944 137.896,51.944 138.1,51.74 141.732,51.74 143.739,53.746 153.619,53.746 155.499,55.626 v1(156.718,55.626)
LA12: J1A1.14 U9.23 | length 38.4
  F.Cu w0.178: U9.23 v1(64.77,68.326) ; v1(77.724,72.644) 80.54,75.46 90.065,75.46 91.44,76.835 J1A1.14
  B.Cu w0.178: v1(64.77,68.326) 75.184,68.326 77.724,70.866 v1(77.724,72.644)
LA13: J1A1.15 U4.2 U4.14 U6.2 | length 110.1
  F.Cu w0.178: v1(93.98,74.694) J1A1.15 ; v1(118.745,73.787) 118.745,66.802 121.666,63.881 131.826,63.881 135.255,60.452 135.255,51.181 v1(134.62,50.546) U6.2 ; U4.2 v1(170.18,50.927) 170.18,51.181 171.45,52.451 U4.14
  B.Cu w0.178: v1(93.98,74.694) 98.89,74.694 99.797,73.787 v1(118.745,73.787) ; v1(134.62,50.546) 134.95,50.216 137.897,50.216 138.328,50.648 143.104,50.648 144.729,52.273 153.34,52.273 154.889,50.724 156.713,50.724 157.018,50.419 169.672,50.419 v1(170.18,50.927)
LRC: U1.11 U5.10 | length 87.5
  F.Cu w0.178: U1.11 92.71,61.976 95.758,58.928 95.758,53.1 v1(95.674,53.016) ; U5.10 v1(161.925,55.855)
  B.Cu w0.178: v1(95.674,53.016) 97.586,53.016 98.199,53.629 110.149,53.629 111.888,55.368 121.408,55.368 122.881,56.841 134.696,56.841 135.056,57.201 145.339,57.201 145.749,57.611 160.168,57.611 v1(161.925,55.855)
LROE: U1.1 U5.11 | length 90
  F.Cu w0.178: v1(81.28,52.328) U1.1 ; v1(159.893,55.855) 160.655,55.093 U5.11
  B.Cu w0.178: v1(81.28,52.328) 81.563,52.045 110.343,52.045 112.553,54.254 122.58,54.254 123.977,55.651 146.482,55.651 147.451,56.62 159.127,56.62 v1(159.893,55.855)
LWC: U3.11 U5.5 | length 69.9
  F.Cu w0.178: U3.11 110.49,66.421 112.522,64.389 112.522,54.282 v1(113.234,53.569) ; v1(158.648,55.855) 158.75,55.753 158.75,51.181 159.385,50.546 U5.5
  B.Cu w0.178: v1(113.234,53.569) 122.594,53.569 124.32,55.296 147.752,55.296 148.721,56.265 158.238,56.265 v1(158.648,55.855)
LWOE: U3.1 U5.6 | length 76.8
  F.Cu w0.178: U3.1 99.06,54.101 v1(100.171,52.99) ; U5.6 160.655,50.8 161.29,51.435 161.29,55.499 v1(160.934,55.855)
  B.Cu w0.178: v1(100.171,52.99) 110.272,52.99 112.248,54.966 121.641,54.966 123.161,56.486 135.48,56.486 135.839,56.845 146.177,56.845 146.308,56.976 159.813,56.976 v1(160.934,55.855)
Net-(D1-A): D1.2 R2.1 | length 2.7
  F.Cu w0.178: R2.1 126.238,51.741 126.238,50.546 D1.2
Net-(D1-K): D1.1 J2.1 J3.39 | length 12.5
  F.Cu w0.178: J3.39 118.904,48.514 123.444,48.514 124.514,47.444 D1.1 128.089,47.444 128.143,47.498 J2.1
Net-(J1D1-P3): J1D1.3 JP2.2
Net-(J2-P2): J2.2 R1.1 | length 3.6
  F.Cu w0.178: R1.1 128.524,51.054 J2.2
Net-(J4-Pin_2): J4.2 RN3.8 SW1.3 U9.2 | length 36.7
  F.Cu w0.178: J4.2 53.696,53.543 55.575,53.543 55.753,53.721 SW1.3 55.753,57.277 54.902,58.128 RN3.8 57.15,59.309 59.182,61.341 59.182,65.024 59.563,65.405 61.468,65.405 61.925,65.862 61.925,67.335 62.357,67.767 v1(62.357,69.592) ; v1(72.644,70.485) 73.279,69.85 U9.2
  B.Cu w0.178: v1(62.357,69.592) 63.504,70.739 72.39,70.739 v1(72.644,70.485)
Net-(J4-Pin_4): J4.4 RN3.7 SW1.4 U9.3 | length 38.8
  F.Cu w0.178: SW1.4 53.213,57.15 54.102,58.039 RN3.7 54.102,60.071 54.229,60.198 55.499,60.198 55.626,60.325 55.626,61.595 54.991,62.23 v1(54.991,70.231) ; v1(72.644,71.501) 73.025,71.12 U9.3
  B.Cu w0.178: SW1.4 53.594,55.499 J4.4 ; v1(54.991,70.231) 56.261,71.501 v1(72.644,71.501)
Net-(U4A-O1): U4.5 U5.1 | length 22.9
  F.Cu w0.178: U5.1 154.305,50.317 v1(154.356,50.368) ; U4.5 v1(173.99,50.419)
  B.Cu w0.178: v1(154.356,50.368) 155.753,50.368 156.058,50.063 173.634,50.063 v1(173.99,50.419)
Net-(U4B-O1): U4.11 U5.15 | length 23.1
  F.Cu w0.178: v1(155.575,52.197) U5.15 ; v1(175.26,52.197) U4.11
  B.Cu w0.178: v1(155.575,52.197) 155.684,52.306 175.151,52.306 v1(175.26,52.197)
Net-(U6A-O3): U6.7 U6.15 | length 14.8
  F.Cu w0.178: U6.15 134.62,51.816 133.985,51.181 133.985,47.625 134.112,47.498 140.716,47.498 140.97,47.752 U6.7
PLatch: U5.4 U8.11 | length 95.4
  F.Cu w0.178: v1(73.025,52.959) U8.11 ; U5.4 v1(158.115,51.029)
  B.Cu w0.178: v1(73.025,52.959) 79.248,52.959 80.518,51.689 110.617,51.689 111.506,52.578 132.512,52.578 133.782,51.308 134.976,51.308 135.712,50.571 137.516,50.571 137.973,51.029 142.621,51.029 144.323,52.73 153.645,52.73 155.296,51.079 158.064,51.079 v1(158.115,51.029)
PR{slash}{\W\}\: J1A1.4 U2.1 | length 106.8
  F.Cu w0.178: v1(141.986,76.581) 141.986,72.771 149.098,65.659 161.798,65.659 163.195,64.262 U2.1
  B.Cu w0.178: J1A1.4 67.56,77.22 121.677,77.22 122.316,76.581 v1(141.986,76.581)
unconnected-(J1-Pin_8-Pad8): J1.8
unconnected-(J1A1-P16-Pad16): J1A1.16
unconnected-(J1B1-P1-Pad1): J1B1.1
unconnected-(J1B1-P2-Pad2): J1B1.2
unconnected-(J1B1-P3-Pad3): J1B1.3
unconnected-(J1B1-P4-Pad4): J1B1.4
unconnected-(J1B1-P5-Pad5): J1B1.5
unconnected-(J1C1-P1-Pad1): J1C1.1
unconnected-(J1C1-P2-Pad2): J1C1.2
unconnected-(J1C1-P3-Pad3): J1C1.3
unconnected-(J1C1-P4-Pad4): J1C1.4
unconnected-(J1C1-P5-Pad5): J1C1.5
unconnected-(J3-P19-Pad19): J3.19
unconnected-(J3-P20-Pad20): J3.20
unconnected-(J3-P21-Pad21): J3.21
unconnected-(J3-P27-Pad27): J3.27
unconnected-(J3-P29-Pad29): J3.29
unconnected-(J3-P31-Pad31): J3.31
unconnected-(J3-P32-Pad32): J3.32
unconnected-(J3-P34-Pad34): J3.34
unconnected-(J3-P44-Pad44): J3.44
unconnected-(RN3-R4.2-Pad5): RN3.5
unconnected-(U4A-O0-Pad4): U4.4
unconnected-(U4A-O2-Pad6): U4.6
unconnected-(U4A-O3-Pad7): U4.7
unconnected-(U4B-O0-Pad12): U4.12
unconnected-(U4B-O2-Pad10): U4.10
unconnected-(U4B-O3-Pad9): U4.9
unconnected-(U5A-O3-Pad7): U5.7
unconnected-(U5B-O0-Pad12): U5.12
unconnected-(U5B-O3-Pad9): U5.9
unconnected-(U6A-O0-Pad4): U6.4
unconnected-(U6A-O1-Pad5): U6.5
unconnected-(U6B-O0-Pad12): U6.12
unconnected-(U6B-O1-Pad11): U6.11
VCC: A1.1 A2.1 A3.1 A4.1 A5.1 A6.1 A7.1 A8.1 C1.1 J1.6 J1A1.2 J1D1.1 J1D1.17 J3.38 J3.41 J3.42 R1.2 R2.2 RN1.1 RN1.2 RN1.3 RN1.4 RN2.1 RN2.2 RN2.3 RN2.4 RN3.1 RN3.2 RN3.3 RN3.4 RN4.1 RN4.2 RN4.3 RN4.4 RN5.1 RN5.2 RN5.3 RN5.4 U1.20 U2.20 U3.20 U4.16 U5.16 U6.16 U7.15 U7.20 U8.20 U9.32 | length 97.1
  F.Cu w0.254: RN3.4 52.502,62.027 v1(52.578,62.103) 53.34,62.103 ; RN3.3 53.302,62.065 53.34,62.103 ; RN3.2 54.102,62.103 ; RN3.1 54.902,61.684 54.483,62.103 54.102,62.103 ; RN2.4 83.071,74.663 83.058,74.676 83.82,74.676 ; RN2.3 83.871,74.625 83.82,74.676 ; RN2.2 84.671,74.638 84.709,74.676 ; RN2.1 85.471,74.676 ; RN1.4 88.659,74.663 88.646,74.676 ; RN1.3 89.459,74.625 89.408,74.676 ; RN1.2 90.259,74.638 90.297,74.676 ; RN1.1 91.059,74.676 90.297,74.676 ; RN4.4 100.47,74.663 100.457,74.676 101.219,74.676 ; RN4.3 101.27,74.625 101.219,74.676 ; RN4.2 102.07,74.638 102.108,74.676 ; RN4.1 102.87,74.676 ; RN5.4 106.058,74.663 106.045,74.676 ; RN5.3 106.858,74.625 106.807,74.676 ; RN5.2 107.658,74.587 107.569,74.676 ; RN5.1 108.458,74.676 107.569,74.676 ; U7.15 v1(123.19,71.247) ; 53.34,62.103 54.102,62.103 ; 83.82,74.676 84.709,74.676 ; 84.709,74.676 85.471,74.676 ; 85.471,74.676 88.646,74.676 ; 88.646,74.676 89.408,74.676 ; 89.408,74.676 90.297,74.676 ; 101.219,74.676 102.108,74.676 ; 102.108,74.676 102.87,74.676 ; 102.87,74.676 106.045,74.676 ; 106.045,74.676 106.807,74.676 ; 106.807,74.676 107.569,74.676
  F.Cu w0.381: U9.32 v1(75.692,67.31) ; v1(95.123,68.707) 95.161,68.745 A2.1 97.879,68.745 97.917,68.707 98.708,68.707 U3.20 ; R1.2 128.524,55.499 129.366,54.657 v1(131.318,54.657) A6.1 132.68,53.175 U6.16
  F.Cu w0.508: C1.1 53.34,74.549 54.229,75.438 55.626,75.438 57.023,76.835 60.579,76.835 60.96,77.216 J1A1.2 ; v1(152.146,55.245) A1.1 152.442,53.845 U5.16 ; v1(166.751,55.499) A8.1 167.047,53.845 U4.16
  F.Cu w0.8: v1(59.309,59.69) A7.1 59.728,57.785 U8.20 ; v1(78.994,70.358) A3.1 79.384,68.355 U1.20 ; v1(114.554,70.104) A5.1 114.944,68.355 U7.20 ; J3.42 119.92,51.467 121.158,52.705 R2.2 ; v1(158.877,72.517) 158.915,72.555 A4.1 161.172,72.165 U2.20
  other v1: 86.995,74.676 104.521,74.676
{\B\I\O\R\D\}\: J1.14 J3.25 U7.4 | length 94.7
  F.Cu w0.178: J3.25 104.927,48.537 104.927,50.571 v1(108.712,54.356) ; v1(120.65,56.896) U7.4
  B.Cu w0.178: v1(108.712,54.356) 108.772,54.356 110.931,56.515 120.269,56.515 v1(120.65,56.896) 122.301,58.547 140.97,58.547 141.732,59.309 177.927,59.309 185.623,67.005 J1.14
{\B\I\O\W\R\}\: J1.16 J3.23 U7.3 | length 97.5
  F.Cu w0.178: J3.23 102.921,48.531 102.921,50.47 106.807,54.356 v1(107.696,54.356) ; v1(119.38,57.15) U7.3
  B.Cu w0.178: v1(107.696,54.356) 110.49,57.15 v1(119.38,57.15) 121.412,59.182 140.462,59.182 141.351,60.071 177.743,60.071 J1.16
{\I\O\R\D\}\: J1A1.3 U4.13 U7.16 U9.24 | length 144.9
  F.Cu w0.178: J1A1.3 63.5,77.343 62.865,76.708 62.865,72.161 66.04,68.986 U9.24 ; U7.16 121.92,71.628 121.92,72.644 v1(121.92,75.565) ; v1(126.365,75.565) 137.16,64.77 156.337,64.77 164.846,56.261 171.704,56.261 172.72,55.245 U4.13
  B.Cu w0.178: J1A1.3 66.606,75.634 121.851,75.634 v1(121.92,75.565) v1(126.365,75.565)
{\I\O\W\R\}\: J1D1.2 U4.3 U7.17 U9.31 | length 141.3
  F.Cu w0.178: U9.31 73.025,66.04 72.009,67.056 72.009,72.136 v1(74.549,74.676) ; U7.17 v1(120.65,74.549) ; v1(141.097,74.549) 141.097,72.771 148.59,65.278 157.022,65.278 165.535,56.765 172.47,56.765 173.355,55.88 173.355,52.197 171.45,50.292 U4.3
  B.Cu w0.178: v1(74.549,74.676) 75.151,75.278 113.14,75.278 113.868,74.549 v1(120.65,74.549) v1(141.097,74.549) 143.129,74.549 J1D1.2
{\P\S\}\: JP2.1 U2.19 U4.1 U4.15 U6.1 | length 86.4
  F.Cu w0.178: U6.1 133.35,51.816 133.985,52.451 133.985,55.372 134.214,55.601 v1(134.214,57.48) ; JP2.1@149.86,76.078 JP2.1@149.865,76.073 ; JP2.1 159.644,76.195 161.163,74.676 163.703,74.676 164.465,73.914 U2.19 164.465,69.748 163.83,69.113 163.83,59.715 v1(166.014,57.531) ; U4.1 168.91,51.181 170.18,52.451 U4.15 v1(170.18,55.626)
  B.Cu w0.178: v1(134.214,57.48) 134.29,57.556 144.374,57.556 144.784,57.967 164.334,57.967 164.77,57.531 v1(166.014,57.531) 168.275,57.531 v1(170.18,55.626)
{\R\S\T\-\B\}\: J3.1 U7.2 | length 45
  F.Cu w0.178: v1(111.76,51.181) 118.11,57.531 U7.2
  B.Cu w0.178: J3.1 80.899,48.509 80.899,50.419 81.077,50.597 111.176,50.597 v1(111.76,51.181)
{\R\S\T\}\: J1D1.15 U7.18 U8.1 | length 149.6
  F.Cu w0.178: U8.1 61.595,47.117 62.205,46.507 76.987,46.507 77.724,47.244 v1(77.724,67.31) ; U7.18 v1(119.38,70.358)
  B.Cu w0.178: v1(77.724,67.31) 77.724,67.564 80.264,70.104 81.026,70.866 113.665,70.866 118.872,70.866 v1(119.38,70.358) 120.105,69.633 143.129,69.633 144.309,68.453 151.257,68.453 159.893,77.089 178.689,77.089 J1D1.15
{\U\S\B\_\C\S\}\: J1.12 U6.9 | length 52.1
  F.Cu w0.178: U6.9 v1(142.24,58.547)
  B.Cu w0.178: v1(142.24,58.547) 142.422,58.729 181.481,58.729 J1.12
pads on no net: J1.M

## Polygon pours and split planes (outlines as drawn)
GND on F.Cu "F.Cu-GND" (solid, remove dead copper, pour order 0): 193.04,78.74 193.04,46.99 191.77,45.72 52.07,45.72 50.8,46.99 50.8,78.74 52.07,80.01 191.77,80.01
GND on In1.Cu "In1.Cu-GND" (solid, remove dead copper, pour order 1): 193.04,78.74 193.04,46.99 191.77,45.72 52.07,45.72 50.8,46.99 50.8,78.74 52.07,80.01 191.77,80.01
GND on B.Cu "B.Cu-GND" (solid, remove dead copper, pour order 2): 193.04,78.74 193.04,46.99 191.77,45.72 52.07,45.72 50.8,46.99 50.8,78.74 52.07,80.01 191.77,80.01
VCC on In2.Cu "In2.Cu-VCC" (solid, remove dead copper, pour order 3): 192.976,78.803 192.976,47.053 191.707,45.783 52.006,45.783 50.736,47.053 50.736,78.803 52.006,80.073 191.707,80.073

## Keep-outs
F.Cu:
  region: 150.241,49.53 150.241,47.752 148.971,46.355 146.558,46.355 145.288,47.752 145.288,49.53 146.558,50.8 148.971,50.8
  region: 57.709,45.72 50.8,45.72 50.8,57.912 57.709,57.912
  region: 150.241,73.66 150.241,71.882 148.971,70.485 146.558,70.485 145.288,71.882 145.288,73.66 146.558,74.93 148.971,74.93
B.Cu:
  region: 150.241,49.53 150.241,47.752 148.971,46.355 146.558,46.355 145.288,47.752 145.288,49.53 146.558,50.8 148.971,50.8
  region: 57.709,45.72 50.8,45.72 50.8,57.912 57.709,57.912
  region: 150.241,73.66 150.241,71.882 148.971,70.485 146.558,70.485 145.288,71.882 145.288,73.66 146.558,74.93 148.971,74.93
Edge.Cuts:
  lines w0: 50.8,48.26 ccw(c53.34,48.26) 53.34,45.72 190.5,45.72 ccw(c190.5,48.26) 193.04,48.26 193.04,77.47 ccw(c190.5,77.47) 190.5,80.01 53.34,80.01 ccw(c53.34,77.47) 50.8,77.47 50.8,48.26
  lines w0.254: 50.8,48.26 ccw(c53.34,48.26) 53.34,45.72 190.5,45.72 ccw(c190.5,48.26) 193.04,48.26 193.04,77.47 ccw(c190.5,77.47) 190.5,80.01 53.34,80.01 ccw(c53.34,77.47) 50.8,77.47 50.8,48.26

## Silkscreen, mask and mechanical layers (free items; w line width, h text height)
F.SilkS:
  text "© 2026 I Stocks" at 172.324,74.815 h1.5
  text "+" at 55.69,72.073 h1.5
  text "Disable / Flash" at 55.293,67.223 h1 r270
  text "Acorn IDE Podule V6-8b" at 138.903,65.423 h1.5
  text "1" at 77.42,46.889 h1.5
B.SilkS:
  text "This side to face rear of computer" at 110.537,71.849 h1
  text "Fit CH376 Module / on this side" at 181.22,57.313 h1 r270
Dwgs.User:
  lines w0.254: 38.1,15.24 208.28,15.24 ; 43.18,45.72 195.58,45.72 ; 45.72,80.01 196.85,80.01 ; 50.8,10.16 50.8,99.06 ; 193.04,0 193.04,101.6